# Altium PCB Copy of TQ210_BOARD_V4-20121031.PcbDoc (part 8 of 8)
Units mm, origin at the board's own origin, x right, y up, seen from the top; angles counter-clockwise.
Board outline 191.2 x 131.27 mm, 2 copper layers (TopLayer, BottomLayer); 362 components, 455 nets, 1594 pads, 630 vias.
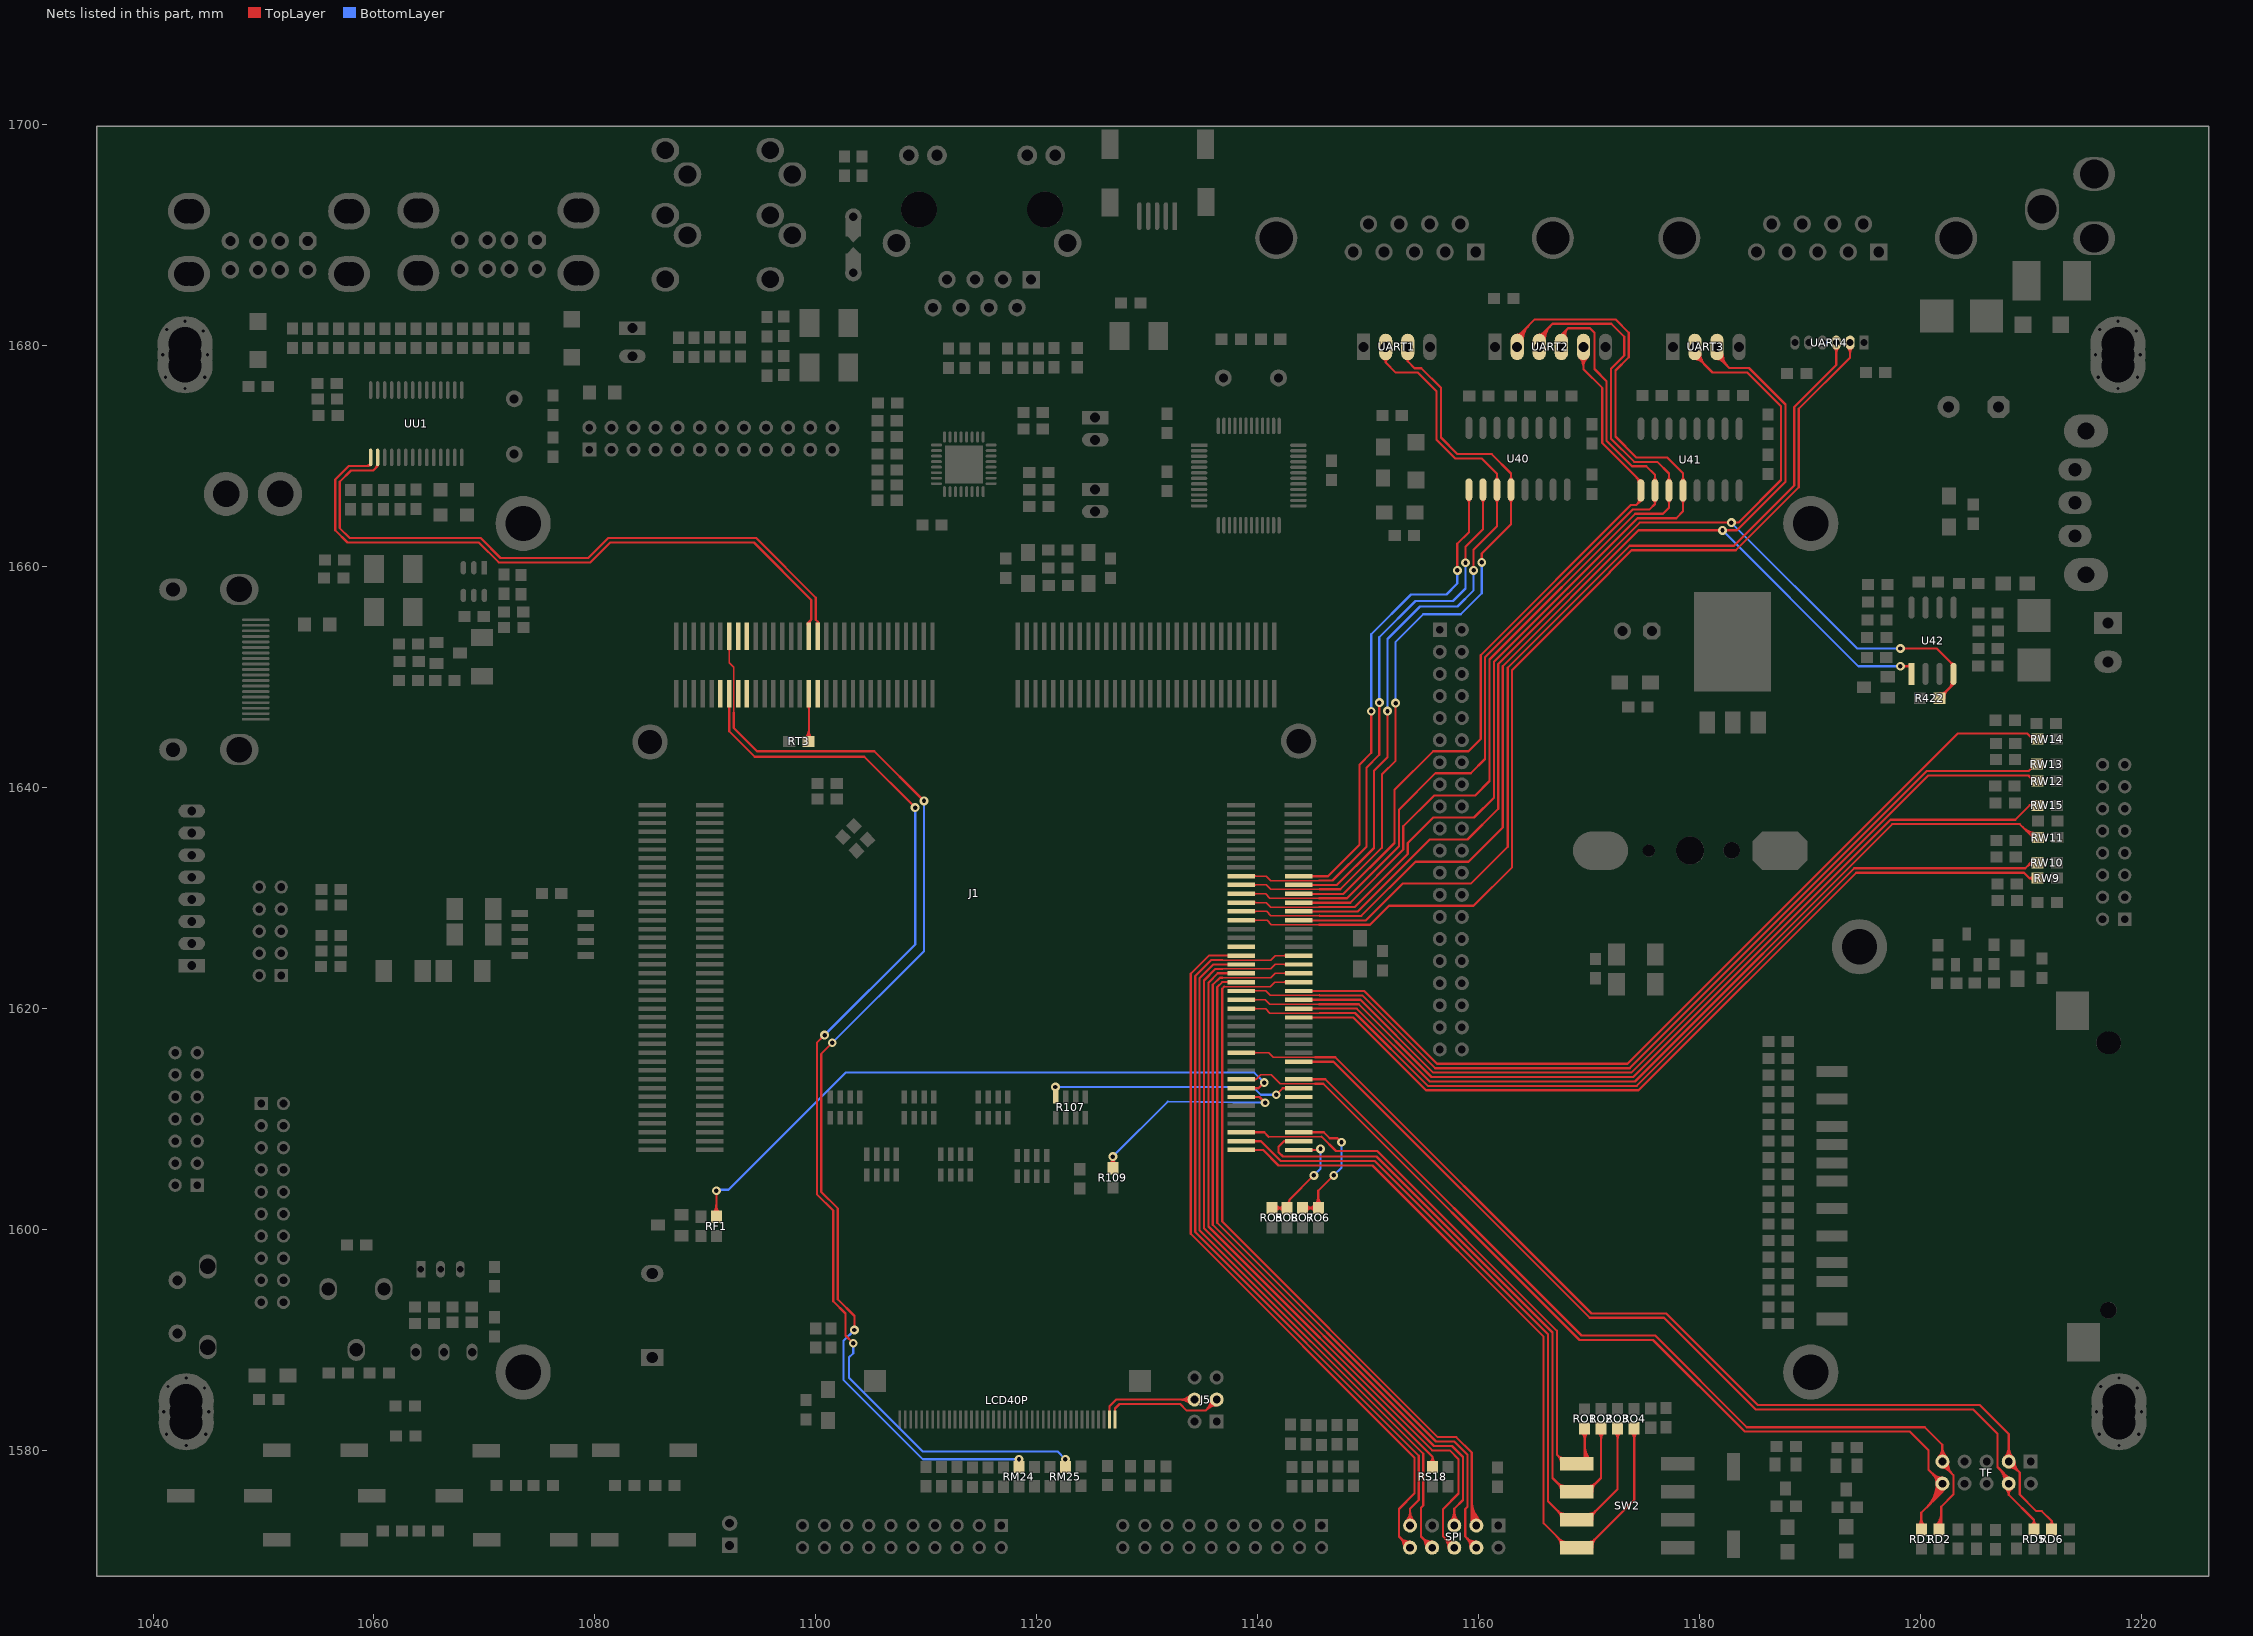
[diagram p8: the nets of this part, all layers, seen from the top]

## Via types
v1: diameter 1, hole 0.5, TopLayer to BottomLayer, 458 vias
v2: diameter 0.8, hole 0.4, TopLayer to BottomLayer, 172 vias

## Nets (pads, with @x,y where several pads share a name; then routed paths per layer and width w, separated by ;. In a path a pad name is that pad's centre, name@x,y a point inside that pad or via, vN(x,y) a via of type N, cw(c..) or ccw(c..) an arc to the next point about the centre after c; other vN are vias at no path point) (continued)
XMMC1DATA0: J1.263 RD2.2 TF.9 | length 89.9
  TopLayer w0.2: J1.263@1143.715,1613.595 1146.129,1613.595 1169.323,1590.4 1176,1590.4 1184.3,1582.1 1200.4,1582.1 1202,1580.5 TF.9@1202,1579 ; RD2.2@1201.417,1573.183 ccw(c1200.251,1574.349) 1201.9,1574.349 ; RD2.2@1201.559,1573.041 ccw(c1200.734,1573.866) 1201.9,1573.866 ; TF.9@1201.633,1579.367 ccw(c1200.746,1580.254) 1202,1580.254 ; RD2.2@1201.7,1572.9 ccw(c1201.217,1573.383) 1201.9,1573.383 ccw(c1202.183,1573.383) RD2.2@1201.983,1573.183 ; TF.9@1201.774,1579.226 ccw(c1201.229,1579.771) 1202,1579.771 ; RD2.2@1201.9,1572.85 1201.9,1574.9 1203,1576 1203,1577.75 1202.011,1578.739 TF.9@1202.011,1578.989 ; 1202,1579.824 ccw(c1202.846,1579.824) TF.9@1202.248,1579.226 ; 1202,1580.307 ccw(c1203.329,1580.307) TF.9@1202.389,1579.367 ; TF.9@1202.011,1578.454 cw(c1202.011,1577.765) 1202.498,1578.252 ; TF.9@1202.144,1578.968 ccw(c1202.759,1578.871) 1202.319,1578.431 ; TF.9@1202.342,1578.937 ccw(c1203.24,1578.796) 1202.597,1578.153 ; TF.9@1202.54,1578.906 ccw(c1203.72,1578.72) 1202.875,1577.875
XMMC1DATA1: J1.264 RD1.2 TF.10 | length 99
  TopLayer w0.135: J1.264@1138.515,1613.595 1139.9,1613.595 1140.305,1614 1141.234,1614 1142.039,1613.194 1145.194,1613.194 1145.2,1613.2 ; J1.264@1139.658,1613.501 cw(c1139.884,1613.275) 1139.884,1613.595 cw(c1139.884,1613.914) J1.264@1139.658,1613.688
  TopLayer w0.2: 1145.2,1613.2 1145.957,1613.2 1145.957,1613.195 1169.152,1590 1175.8,1590 1184.1,1581.7 1199.05,1581.7 1200.75,1580 1200.75,1578.25 TF.10@1202.011,1576.989 1202.011,1576.261 ; RD1.2@1199.817,1573.183 ccw(c1199.134,1573.866) 1200.1,1573.866 ccw(c1201.066,1573.866) RD1.2@1200.383,1573.183 ; RD1.2@1200.1,1572.85 1200.1,1574.35 1202.011,1576.261 ; 1200.583,1574.833 ccw(c1198.427,1576.989) 1201.476,1576.989 ccw(c1200.184,1576.989) 1201.098,1577.902 ccw(c1202.011,1578.815) TF.10@1202.011,1577.524 ; 1200.925,1575.175 ccw(c1199.11,1576.989) 1201.676,1576.989 ccw(c1200.867,1576.989) 1201.439,1577.561 ccw(c1202.011,1578.133) TF.10@1202.011,1577.324 ; 1201.266,1575.516 ccw(c1199.793,1576.989) TF.10@1201.876,1576.989 ; 1201.607,1575.857 ccw(c1200.476,1576.989) TF.10@1202.076,1576.989 ; TF.10@1201.851,1576.478 cw(c1201.784,1576.261) 1202.011,1576.261 ; 1201.949,1576.199 ccw(c1201.159,1576.989) TF.10@1202.276,1576.989 ; TF.10@1202.171,1576.478 ccw(c1202.239,1576.261) 1202.011,1576.261
XMMC1DATA2: J1.258 RD6.2 TF.3 | length 102.3
  TopLayer w0.135: J1.258@1138.515,1615.995 1141,1615.995 1141.401,1615.593 1145.193,1615.593 ; J1.258@1139.658,1615.901 cw(c1139.884,1615.675) 1139.884,1615.995 cw(c1139.884,1616.314) J1.258@1139.658,1616.088
  TopLayer w0.2: 1145.2,1615.6 1145.205,1615.595 1147.036,1615.595 1170.231,1592.4 1177,1592.4 1185.3,1584.1 1205.4,1584.1 1208.011,1581.489 TF.3@1208.011,1578.989 1209,1578 1209,1576 1210.5,1574.5 1211,1574.5 1211.9,1573.6 ; TF.3@1207.633,1579.367 ccw(c1206.719,1580.28) 1208.011,1580.28 ccw(c1209.303,1580.28) TF.3@1208.389,1579.367 ; TF.3@1207.774,1579.226 ccw(c1207.202,1579.798) 1208.011,1579.798 ccw(c1208.82,1579.798) TF.3@1208.248,1579.226 ; TF.3@1208.011,1578.454 cw(c1208.011,1577.162) 1208.924,1578.075 cw(c1209.838,1578.989) TF.3@1208.546,1578.989 ; TF.3@1208.011,1578.654 cw(c1208.011,1577.845) 1208.583,1578.417 cw(c1209.155,1578.989) TF.3@1208.346,1578.989 ; RD6.2@1211.697,1573.245 ccw(c1211.488,1573.6) 1211.9,1573.6 ; RD6.2@1211.9,1572.85 1211.9,1573.6 ; RD6.2@1212.103,1573.245 cw(c1212.312,1573.6) 1211.9,1573.6
XMMC1DATA3: J1.259 RD5.2 TF.4 | length 93.3
  TopLayer w0.2: J1.259@1143.715,1615.195 1146.871,1615.195 1170.065,1592 1176.8,1592 1178.162,1590.638 1185.1,1583.7 1204.8,1583.7 1207,1581.5 1207,1578.5 1208.011,1577.489 1208.011,1575.989 ; 1207.09,1578.41 cw(c1205.675,1576.995) TF.4@1207.676,1576.99 ; 1207.43,1578.07 cw(c1206.354,1576.993) TF.4@1207.876,1576.989 ; TF.4@1207.714,1576.544 cw(c1207.344,1575.989) 1208.011,1575.989 ; 1207.77,1577.73 cw(c1207.032,1576.992) TF.4@1208.076,1576.989 ; TF.4@1208.308,1576.544 ccw(c1208.678,1575.989) 1208.011,1575.989 ; RD5.2@1210.06,1573.22 ccw(c1209.7,1573.7) 1210.3,1573.7 ; RD5.2@1210.3,1572.85 1210.3,1573.7 ; RD5.2@1210.54,1573.22 cw(c1210.9,1573.7) 1210.3,1573.7 ; 1208.011,1575.989 1210.3,1573.7
XMMC2CDN: J1.92
XMMC2CLK: J1.96
XMMC2CMD: J1.95
XMMC2DATA0: J1.97 | length 0
  TopLayer w0.2: J1.97@1093.765,1653.697 J1.97@1093.775,1653.707
XMMC2DATA1: J1.98
XMMC2DATA2: J1.93 RM24.2 | length 105.7
  TopLayer w0.135: J1.93@1092.071,1652.553 cw(c1091.845,1652.327) 1092.165,1652.327 cw(c1092.484,1652.327) J1.93@1092.258,1652.553 ; J1.93@1092.165,1653.697 1092.165,1651.315 1092.564,1650.916 1092.564,1646.826
  TopLayer w0.2: 1092.581,1646.809 1092.581,1645.4 1094.681,1643.3 1105.3,1643.3 v2(1109.8,1638.8) ; v2(1101.5,1616.9) 1100.5,1615.9 1100.5,1603.4 1101.99,1601.91 1101.99,1593.676 1103.5,1592.166 v2(1103.5,1590.9)
  BottomLayer w0.2: v2(1101.5,1616.9) 1109.8,1625.2 v2(1109.8,1638.8) ; v2(1103.5,1590.9) 1102.5,1589.9 1102.5,1586.4 1109.7,1579.2 v2(1118.4,1579.2)
XMMC2DATA3: J1.94 RM25.2 | length 102.6
  TopLayer w0.2: J1.94@1092.175,1648.487 1092.175,1645.1 1094.475,1642.8 1104.4,1642.8 v2(1109,1638.2) ; v2(1100.8,1617.6) 1100.1,1616.9 1100.1,1603.2 1101.59,1601.71 1101.59,1593.51 1102.7,1592.4 1102.7,1590.4 v2(1103.4,1589.7)
  BottomLayer w0.2: v2(1100.8,1617.6) 1109,1625.8 v2(1109,1638.2) ; v2(1103.4,1589.7) 1103.4,1588.8 1103,1588.4 1103,1586.6 1109.7,1579.9 1121.9,1579.9 v2(1122.6,1579.2)
XMMC3CDN: J1.246 RW15.1 | length 86.5
  TopLayer w0.135: J1.246@1138.515,1620.795 1140.716,1620.795 1141.115,1620.395 1145.594,1620.395 ; J1.246@1139.658,1620.701 cw(c1139.884,1620.475) 1139.884,1620.795 cw(c1139.884,1621.114) J1.246@1139.658,1620.888
  TopLayer w0.2: 1145.595,1620.395 1145.6,1620.4 ; 1145.605,1620.395 1149.158,1620.395 1155.753,1613.8 1174.003,1613.8 1197.303,1637.1 1208.6,1637.1 1209.905,1638.405 ; RW15.1@1210.218,1638.217 ccw(c1209.905,1638.05) 1209.905,1638.405 ; RW15.1@1210.218,1638.593 cw(c1209.905,1638.76) 1209.905,1638.405 ; RW15.1@1210.621,1638.405 1209.905,1638.405
XMMC3CLK: J1.247 RW11.1 | length 82.7
  TopLayer w0.2: J1.247@1143.715,1619.995 1148.993,1619.995 1155.587,1613.4 1174.169,1613.4 1197.469,1636.7 1209,1636.7 RW11.1@1210.2,1635.5 ; 1209.268,1636.432 ccw(c1210.615,1637.778) RW11.1@1210.615,1635.874 ; 1209.61,1636.09 ccw(c1210.615,1637.095) RW11.1@1210.615,1635.674 ; 1209.951,1635.749 ccw(c1210.615,1636.412) RW11.1@1210.615,1635.474
XMMC3CMD: J1.245 RW12.1 | length 81.7
  TopLayer w0.2: J1.245@1143.715,1620.795 1149.324,1620.795 1155.919,1614.2 1173.837,1614.2 1200.737,1641.1 1209.8,1641.1 RW12.1@1210.3,1640.6 ; 1209.938,1640.962 ccw(c1210.157,1641.18) RW12.1@1210.338,1640.93 ; RW12.1@1210.084,1640.816 cw(c1209.873,1640.605) RW12.1@1210.171,1640.605 ; RW12.1@1210.104,1640.796 ccw(c1210.296,1640.987) RW12.1@1210.455,1640.767
XMMC3DATA0: J1.248 RW10.1 | length 86.1
  TopLayer w0.135: J1.248@1138.515,1619.995 1140.721,1619.995 1141.122,1619.593 1145.604,1619.593 ; J1.248@1139.658,1619.901 cw(c1139.884,1619.675) 1139.884,1619.995 cw(c1139.884,1620.314) J1.248@1139.658,1620.088
  TopLayer w0.2: 1145.605,1619.595 1148.827,1619.595 1155.422,1613 1174.334,1613 1194.034,1632.7 1209.5,1632.7 1210,1633.2 ; 1209.717,1632.917 cw(c1210.005,1632.628) RW10.1@1210.291,1632.919 ; 1209.86,1633.06 cw(c1210.147,1632.772) RW10.1@1210.431,1633.062 ; 1210.002,1633.202 cw(c1210.288,1632.916) RW10.1@1210.571,1633.205 ; RW10.1@1210.194,1633.338 cw(c1210,1633.406) 1210,1633.2 ; RW10.1@1210.197,1633.064 ccw(c1210,1632.989) 1210,1633.2 ; RW10.1@1210.4,1633.2 1210,1633.2
XMMC3DATA1: J1.249 RW9.1 | length 78.8
  TopLayer w0.2: J1.249@1143.715,1619.195 1148.661,1619.195 1155.256,1612.6 1174.5,1612.6 1194.2,1632.3 1209.4,1632.3 1209.895,1631.805 ; RW9.1@1210.221,1631.612 ccw(c1209.895,1631.433) 1209.895,1631.805 ; RW9.1@1210.221,1631.998 cw(c1209.895,1632.177) 1209.895,1631.805 ; RW9.1@1210.621,1631.805 1209.895,1631.805
XMMC3DATA2: J1.243 RW14.1 | length 83.1
  TopLayer w0.2: J1.243@1143.715,1621.595 1149.655,1621.595 1156.25,1615 1173.5,1615 ; 1173.503,1614.997 1203.406,1644.9 1209.7,1644.9 1210.195,1644.405 RW14.1@1210.621,1644.405 ; 1209.888,1644.712 ccw(c1210.101,1644.925) RW14.1@1210.303,1644.701 ; 1210.037,1644.563 ccw(c1210.242,1644.769) RW14.1@1210.437,1644.553
XMMC3DATA3: J1.244 RW13.1 | length 86.4
  TopLayer w0.135: J1.244@1138.515,1621.595 1140.753,1621.595 1141.154,1621.194 1145.594,1621.194
  TopLayer w0.2: 1145.6,1621.2 1145.605,1621.195 1149.49,1621.195 1156.084,1614.6 1173.7,1614.6 ; 1173.672,1614.6 1200.572,1641.5 1209.8,1641.5 1210.427,1642.127 RW13.1@1210.585,1642.127
XOM0: J1.275 RO6.2 RO7.1 | length 17.1
  TopLayer w0.2: J1.275@1143.715,1608.795 1146.005,1608.795 1146.532,1608.268 1147.232,1608.268 v2(1147.6,1607.9) ; RO7.1@1144.078,1601.944 1145.504,1601.944 1145.504,1603.504 v2(1146.9,1604.9) ; RO7.1@1144.361,1601.661 cw(c1145.044,1600.978) 1145.044,1601.944 cw(c1145.044,1602.91) RO7.1@1144.361,1602.227 ; RO7.1@1144.538,1601.944 cw(c1144.538,1600.976) RO6.2@1145.222,1601.661 ; RO7.1@1144.541,1601.944 ccw(c1144.541,1602.908) RO6.2@1145.222,1602.226 ; RO6.2@1145.222,1602.276 ccw(c1144.541,1602.958) 1145.504,1602.958 ; 1145.504,1602.96 ccw(c1146.472,1602.96) RO6.2@1145.788,1602.276
  BottomLayer w0.2: v2(1146.9,1604.9) 1147.6,1605.6 v2(1147.6,1607.9)
XOM1: J1.276 RO1.2 SW2.1 | length 61.1
  TopLayer w0.135: 1141,1608.4 1141.005,1608.395 1145.795,1608.395
  TopLayer w0.2: J1.276@1138.515,1608.795 1140.605,1608.795 1141,1608.4 ; J1.276@1139.635,1608.724 cw(c1139.806,1608.553) 1139.806,1608.795 cw(c1139.806,1609.036) J1.276@1139.635,1608.865 ; 1145.8,1608.4 1147.1,1607.1 1150.834,1607.1 1167.1,1590.834 1167.1,1579.6 1167.9,1578.8 SW2.1@1169.9,1578.8 ; 1167.15,1579.55 ccw(c1167.791,1580.191) SW2.1@1167.926,1579.294 ; 1167.217,1579.483 cw(c1166.534,1578.8) SW2.1@1167.5,1578.8 ; SW2.1@1167.43,1579.27 ccw(c1167.864,1579.704) SW2.1@1167.955,1579.097 ; RO1.2@1169.339,1581.633 cw(c1168.656,1580.95) 1169.622,1580.95 cw(c1170.588,1580.95) RO1.2@1169.905,1581.633 ; SW2.1@1169.446,1579.154 ccw(c1169.023,1579.577) 1169.622,1579.577 ; SW2.1@1169.622,1578.922 RO1.2@1169.622,1581.966 ; 1169.622,1579.471 ccw(c1170.471,1579.471) SW2.1@1169.871,1578.871 ; 1169.622,1579.954 ccw(c1170.954,1579.954) SW2.1@1170.012,1579.012 ; 1169.622,1580.437 ccw(c1171.437,1580.437) SW2.1@1170.154,1579.154
XOM2: J1.277 RO2.1 SW2.2 | length 63.2
  TopLayer w0.2: J1.277@1143.715,1607.995 1142.395,1607.995 1141.9,1607.5 1141.9,1607 1142.3,1606.6 1150.769,1606.6 1166.7,1590.669 1166.7,1577.5 SW2.2@1168.2,1576 ; 1167.044,1577.156 ccw(c1168,1578.112) SW2.2@1168,1576.76 ; 1167.189,1577.011 cw(c1166.438,1576.26) SW2.2@1167.5,1576.26 ; 1167.385,1576.815 ccw(c1168,1577.429) SW2.2@1168,1576.56 ; SW2.2@1167.53,1576.67 cw(c1167.121,1576.26) SW2.2@1167.7,1576.26 ; SW2.2@1169.8,1576.56 ccw(c1169.8,1577.429) 1170.415,1576.815 ; SW2.2@1169.8,1576.76 ccw(c1169.8,1578.112) 1170.756,1577.156 ; SW2.2@1169.86,1576.26 1171.1,1577.5 RO2.1@1171.1,1582 ; SW2.2@1170.1,1576.26 cw(c1170.679,1576.26) SW2.2@1170.27,1576.67 ; SW2.2@1170.3,1576.26 cw(c1171.362,1576.26) 1170.611,1577.011 ; RO2.1@1170.817,1581.667 cw(c1170.134,1580.984) 1171.1,1580.984 cw(c1172.066,1580.984) RO2.1@1171.383,1581.667
XOM3: J1.278 RO3.1 SW2.3 | length 70.2
  TopLayer w0.2: J1.278@1138.515,1607.995 1140.305,1607.995 1142.1,1606.2 1150.603,1606.2 1166.3,1590.503 1166.3,1575.4 SW2.3@1168.2,1573.5 ; J1.278@1139.635,1607.924 cw(c1139.806,1607.753) 1139.806,1607.995 cw(c1139.806,1608.236) J1.278@1139.635,1608.065 ; 1167.112,1574.588 ccw(c1168,1575.475) SW2.3@1168,1574.22 ; 1167.161,1574.539 cw(c1166.341,1573.72) SW2.3@1167.5,1573.72 ; SW2.3@1167.454,1574.246 ccw(c1168,1574.793) SW2.3@1168,1574.02 ; SW2.3@1167.502,1574.198 cw(c1167.024,1573.72) SW2.3@1167.7,1573.72 ; SW2.3@1169.8,1574.02 ccw(c1169.8,1574.793) SW2.3@1170.346,1574.246 ; SW2.3@1169.8,1574.22 ccw(c1169.8,1575.475) 1170.688,1574.588 ; SW2.3@1169.82,1573.72 1172.6,1576.5 RO3.1@1172.6,1582 ; SW2.3@1170.1,1573.72 cw(c1170.776,1573.72) SW2.3@1170.298,1574.198 ; SW2.3@1170.3,1573.72 cw(c1171.459,1573.72) 1170.639,1574.539 ; RO3.1@1172.317,1581.667 cw(c1171.634,1580.984) 1172.6,1580.984 cw(c1173.566,1580.984) RO3.1@1172.883,1581.667
XOM4: J1.279 RO5.2 RO8.1 | length 14.7
  TopLayer w0.2: RO5.2@1141.305,1601.943 RO8.1@1142.657,1601.943 ; RO5.2@1141.588,1601.661 cw(c1142.271,1600.978) 1142.271,1601.943 cw(c1142.271,1602.909) RO5.2@1141.588,1602.226 ; RO5.2@1141.661,1601.943 cw(c1141.661,1600.905) RO8.1@1142.395,1601.639 ; RO5.2@1141.764,1601.943 ccw(c1141.764,1602.836) RO8.1@1142.395,1602.205 ; 1142.144,1601.943 cw(c1142.144,1601.387) RO8.1@1142.537,1601.781 ; RO8.1@1142.616,1602.367 ccw(c1142.563,1602.7) 1142.9,1602.7 ; RO8.1@1142.647,1602.17 ccw(c1142.6,1602.466) RO8.1@1142.9,1602.466 ; RO8.1@1142.9,1601.8 1142.9,1602.7 v2(1145.1,1604.9) ; J1.279@1143.715,1607.195 1145.595,1607.195 v2(1145.7,1607.3) ; J1.279@1144.835,1607.124 cw(c1145.006,1606.953) 1145.006,1607.195 cw(c1145.006,1607.436) J1.279@1144.835,1607.265
  BottomLayer w0.2: v2(1145.1,1604.9) 1145.7,1605.5 v2@1145.7,1607.2
XOM5: J1.280 RO4.1 SW2.4 | length 74.9
  TopLayer w0.2: J1.280@1138.515,1607.206 1140.494,1607.206 1141.9,1605.8 1150.4,1605.8 1165.9,1590.3 1165.9,1573.4 SW2.4@1168.3,1571 ; J1.280@1139.635,1607.135 cw(c1139.806,1606.965) 1139.806,1607.206 cw(c1139.806,1607.447) J1.280@1139.635,1607.277 ; 1167.062,1572.238 cw(c1166.003,1571.18) SW2.4@1167.5,1571.18 ; 1167.351,1571.949 ccw(c1168,1572.597) SW2.4@1168,1571.68 ; 1167.403,1571.897 cw(c1166.686,1571.18) SW2.4@1167.7,1571.18 ; SW2.4@1169.78,1571.18 1174.1,1575.5 RO4.1@1174.1,1582 ; SW2.4@1169.8,1571.48 ccw(c1169.8,1572.156) SW2.4@1170.278,1571.678 ; SW2.4@1169.8,1571.68 ccw(c1169.8,1572.839) 1170.619,1572.019 ; SW2.4@1170.1,1571.18 cw(c1170.873,1571.18) SW2.4@1170.326,1571.726 ; SW2.4@1170.3,1571.18 cw(c1171.555,1571.18) 1170.668,1572.068 ; RO4.1@1173.817,1581.667 cw(c1173.134,1580.984) 1174.1,1580.984 cw(c1175.066,1580.984) RO4.1@1174.383,1581.667
XPWMTOUT0: J1.265 R107.4 | length 22.6
  TopLayer w0.2: v2(1141.7,1612.2) 1142.284,1612.784 J1.265@1143.725,1612.784
  BottomLayer w0.2: v2(1121.7,1612.9) 1139.6,1612.9 1140.3,1612.2 v2(1141.7,1612.2)
XPWMTOUT1: J1.266 RF1.2 | length 61
  TopLayer w0.2: RF1.2@1090.712,1601.482 ccw(c1090.03,1602.167) 1090.997,1602.165 ; RF1.2@1090.995,1601.048 v2(1091,1603.5) ; 1090.997,1602.163 ccw(c1091.962,1602.161) RF1.2@1091.278,1601.48 ; J1.266@1138.525,1612.784 1140.084,1612.784 v2(1140.6,1613.3) ; J1.266@1139.635,1612.724 cw(c1139.781,1612.578) 1139.781,1612.784 ; J1.266@1139.635,1612.865 ccw(c1139.831,1613.061) 1139.831,1612.784
  BottomLayer w0.2: v2(1091,1603.5) v2@1091,1603.603 ; v2@1091.057,1603.604 1092.092,1603.604 1102.688,1614.2 1139.7,1614.2 v2(1140.6,1613.3)
XPWMTOUT2: J1.267
XPWMTOUT3: J1.268 R109.2 | length 21.2
  TopLayer w0.2: R109.2@1126.617,1605.883 ccw(c1125.934,1606.566) 1126.9,1606.566 ccw(c1127.866,1606.566) R109.2@1127.183,1605.883 ; R109.2@1126.9,1605.55 v2(1126.9,1606.6) ; J1.268@1138.515,1611.995 1140.172,1611.995 v2(1140.689,1611.478) ; J1.268@1139.635,1611.924 cw(c1139.806,1611.753) 1139.806,1611.995 cw(c1139.806,1612.236) J1.268@1139.635,1612.065
  BottomLayer w0.2: v2(1126.9,1606.6) 1131.879,1611.578 v2(1140.689,1611.478)
XPWRRGTON: J1.234
XSPICLK0: J1.236 SPI.10 | length 69.9
  TopLayer w0.2: J1.236@1138.515,1624.795 1135.595,1624.795 1133.95,1623.15 1133.95,1599.604 1154.2,1579.354 1154.2,1576.1 1152.8,1574.7 1152.8,1572.2 SPI.10@1153.811,1571.189 ; SPI.10@1153.276,1571.189 ccw(c1151.984,1571.189) 1152.898,1572.102 ccw(c1153.811,1573.015) SPI.10@1153.811,1571.724 ; SPI.10@1153.476,1571.189 ccw(c1152.667,1571.189) 1153.239,1571.761 ccw(c1153.811,1572.333) SPI.10@1153.811,1571.524
XSPICLK1: J1.239 SPI.5 | length 71.6
  TopLayer w0.135: 1136.795,1622.795 1141.185,1622.795 1141.585,1623.195 J1.239@1143.715,1623.195 ; J1.239@1142.571,1623.101 ccw(c1142.345,1622.875) 1142.345,1623.195 ccw(c1142.345,1623.514) J1.239@1142.571,1623.288
  TopLayer w0.2: 1136.795,1622.795 1136.595,1622.795 1135.95,1622.15 1135.95,1600.432 1155.982,1580.4 1157.6,1580.4 1158.6,1579.4 1158.6,1575.5 1157.811,1574.711 SPI.5@1157.811,1573.189 ; SPI.5@1157.433,1573.567 ccw(c1156.519,1574.48) 1157.811,1574.48 ccw(c1159.103,1574.48) SPI.5@1158.189,1573.567 ; SPI.5@1157.574,1573.426 ccw(c1157.002,1573.998) 1157.811,1573.998 ccw(c1158.62,1573.998) SPI.5@1158.048,1573.426
XSPICSN0: J1.237 RS18.1 | length 63.5
  TopLayer w0.135: 1136.796,1623.593 1141.194,1623.593 1141.595,1623.995 J1.237@1143.715,1623.995 ; J1.237@1142.571,1623.901 ccw(c1142.345,1623.675) 1142.345,1623.995 ccw(c1142.345,1624.314) J1.237@1142.571,1624.088
  TopLayer w0.2: 1136.795,1623.595 1136.195,1623.595 1135.15,1622.55 1135.15,1600.101 1155.85,1579.401 ; RS18.1@1155.595,1578.858 ccw(c1155.145,1579.401) 1155.85,1579.401 ; RS18.1@1155.85,1578.5 1155.85,1579.401 ; RS18.1@1156.105,1578.858 cw(c1156.555,1579.401) 1155.85,1579.401
XSPICSN1: J1.241 SPI.3 | length 73
  TopLayer w0.135: 1136.995,1621.995 1141.152,1621.995 1141.552,1622.395 J1.241@1143.715,1622.395 ; J1.241@1142.571,1622.301 ccw(c1142.345,1622.075) 1142.345,1622.395 ccw(c1142.345,1622.714) J1.241@1142.571,1622.488
  TopLayer w0.2: 1136.995,1621.995 1136.795,1621.795 1136.795,1600.719 1156.314,1581.2 1158,1581.2 1159.4,1579.8 1159.4,1573.6 SPI.3@1159.811,1573.189 ; 1159.4,1574.024 ccw(c1160.646,1574.024) SPI.3@1159.765,1573.143 ; 1159.4,1574.507 ccw(c1161.129,1574.507) SPI.3@1159.906,1573.284 ; 1159.4,1574.99 ccw(c1161.612,1574.99) SPI.3@1160.048,1573.426 ; 1159.4,1575.473 ccw(c1162.095,1575.473) SPI.3@1160.189,1573.567
XSPIMISO0: J1.235 SPI.9 | length 72.4
  TopLayer w0.135: 1136.796,1624.396 1141.196,1624.396 1141.595,1624.795 J1.235@1143.715,1624.795 ; J1.235@1142.571,1624.701 ccw(c1142.345,1624.475) 1142.345,1624.795 ccw(c1142.345,1625.114) J1.235@1142.571,1624.888
  TopLayer w0.2: 1136.795,1624.395 1135.795,1624.395 1134.35,1622.95 1134.35,1599.77 1154.6,1579.52 1154.6,1575.5 1153.811,1574.711 SPI.9@1153.811,1573.189 ; SPI.9@1153.433,1573.567 ccw(c1152.519,1574.48) 1153.811,1574.48 ccw(c1155.103,1574.48) SPI.9@1154.189,1573.567 ; SPI.9@1153.574,1573.426 ccw(c1153.002,1573.998) 1153.811,1573.998 ccw(c1154.62,1573.998) SPI.9@1154.048,1573.426
XSPIMISO1: J1.240 SPI.6 | length 69.1
  TopLayer w0.2: J1.240@1138.515,1623.195 1136.4,1623.195 1135.55,1622.345 1135.55,1600.267 1155.817,1580 1157.4,1580 1158.2,1579.2 1158.2,1576.1 1156.8,1574.7 1156.8,1572.2 SPI.6@1157.811,1571.189 ; SPI.6@1157.276,1571.189 ccw(c1155.984,1571.189) 1156.898,1572.102 ccw(c1157.811,1573.015) SPI.6@1157.811,1571.724 ; SPI.6@1157.476,1571.189 ccw(c1156.667,1571.189) 1157.239,1571.761 ccw(c1157.811,1572.333) SPI.6@1157.811,1571.524
XSPIMOSI0: J1.238 SPI.8 | length 68
  TopLayer w0.2: J1.238@1138.515,1623.995 1135.995,1623.995 1134.75,1622.75 1134.75,1599.935 1155,1579.685 1155,1575 1154.8,1574.8 1154.8,1572.2 SPI.8@1155.811,1571.189 ; SPI.8@1155.276,1571.189 ccw(c1153.984,1571.189) 1154.898,1572.102 ccw(c1155.811,1573.015) SPI.8@1155.811,1571.724 ; SPI.8@1155.476,1571.189 ccw(c1154.667,1571.189) 1155.239,1571.761 ccw(c1155.811,1572.333) SPI.8@1155.811,1571.524
XSPIMOSI1: J1.242 SPI.4 | length 67.3
  TopLayer w0.2: J1.242@1138.515,1622.395 1136.795,1622.395 1136.35,1621.95 1136.35,1600.598 1156.148,1580.8 1157.8,1580.8 1159,1579.6 1159,1574.9 1158.8,1574.7 1158.8,1572.2 SPI.4@1159.811,1571.189 ; SPI.4@1159.276,1571.189 ccw(c1157.984,1571.189) 1158.898,1572.102 ccw(c1159.811,1573.015) SPI.4@1159.811,1571.724 ; SPI.4@1159.476,1571.189 ccw(c1158.667,1571.189) 1159.239,1571.761 ccw(c1159.811,1572.333) SPI.4@1159.811,1571.524
XUCTSN0: J1.217 U40.9 | length 45.6
  TopLayer w0.2: J1.217@1143.725,1631.984 1146.384,1631.984 ; 1146.395,1631.995 1149.223,1634.823 1149.223,1642.085 1150.29,1643.151 v2(1150.29,1646.917) ; v2(1158.09,1659.674) 1158.09,1662.09 1159.138,1663.138 U40.9@1159.138,1666.989 ; U40.9@1158.994,1666.133 cw(c1158.644,1665.784) 1159.138,1665.784 cw(c1159.633,1665.784) U40.9@1159.283,1666.133
  BottomLayer w0.2: v2(1150.29,1646.917) 1150.29,1653.89 1153.9,1657.5 1157.1,1657.5 1158.09,1658.49 v2(1158.09,1659.674)
XUCTSN1: J1.221 U41.9 UART2.5 | length 73.4
  TopLayer w0.2: J1.221@1143.725,1630.384 1147.784,1630.384 1152.4,1635 1152.4,1639.8 1155.9,1643.3 1159.1,1643.3 1160.2,1644.4 1160.2,1652 1173.8,1665.6 1174.3,1665.6 1174.71,1666.01 1174.71,1667.69 1171.2,1671.2 1171.2,1676.2 1169.508,1677.892 UART2.5@1169.508,1679.902 ; UART2.5@1169.154,1678.948 cw(c1168.301,1678.095) 1169.508,1678.095 cw(c1170.715,1678.095) UART2.5@1169.861,1678.948 ; UART2.5@1169.296,1679.09 cw(c1168.784,1678.578) 1169.508,1678.578 cw(c1170.232,1678.578) UART2.5@1169.72,1679.09 ; 1174.313,1668.087 cw(c1173.849,1667.623) U41.9@1174.505,1667.623 ; 1174.395,1665.695 ccw(c1174.07,1666.021) U41.9@1174.513,1666.145 ; 1174.474,1667.926 ccw(c1174.71,1668.161) U41.9@1174.71,1667.828
XUHDN: J1.111 UU1.15 | length 61.3
  TopLayer w0.2: 1059.258,1669.123 ccw(c1059.258,1669.691) UU1.15@1059.66,1669.289 ; 1059.54,1669.14 cw(c1059.695,1668.984) UU1.15@1059.695,1669.204 ; UU1.15@1059.695,1669.904 1059.695,1669.295 1059.523,1669.123 1057.723,1669.123 1056.5,1667.9 1056.5,1663.3 1057.6,1662.2 1069.5,1662.2 1071.3,1660.4 1079.6,1660.4 1081.4,1662.2 1094.4,1662.2 1099.6,1657 1099.6,1655.225 ; J1.111@1099.267,1654.727 cw(c1099.521,1654.779) 1099.337,1654.962 ; J1.111@1099.297,1654.82 ccw(c1099.13,1655) 1099.375,1655 ; J1.111@1099.375,1653.687 1099.375,1655 ; 1099.375,1654.963 ccw(c1099.581,1654.963) J1.111@1099.435,1654.818 ; J1.111@1099.463,1654.767 cw(c1099.957,1654.868) 1099.6,1655.225 ; 1099.375,1655 1099.6,1655.225
XUHDP: J1.113 UU1.16 | length 60.8
  TopLayer w0.2: 1060.157,1668.957 ccw(c1059.86,1669.254) UU1.16@1060.28,1669.254 ; UU1.16@1060.33,1669.904 1060.33,1669.13 1059.923,1668.723 1057.923,1668.723 1056.9,1667.7 1056.9,1663.5 1057.8,1662.6 1069.666,1662.6 1071.466,1660.8 1079.4,1660.8 1081.2,1662.6 1094.6,1662.6 1100,1657.2 1100,1655.2 1100.175,1655.025 J1.113@1100.175,1653.687 ; J1.113@1100.094,1654.818 ccw(c1099.898,1655.013) 1100.175,1655.013 ; 1100.154,1655.046 cw(c1099.883,1654.775) J1.113@1100.264,1654.737 ; 1100.175,1654.963 ccw(c1100.381,1654.963) J1.113@1100.235,1654.818
XUHOVERCUR: J1.112 RT3.2 | length 6.7
  TopLayer w0.2: RT3.2@1099.067,1644.483 ccw(c1098.324,1645.226) 1099.375,1645.226 ; RT3.2@1099.209,1644.341 ccw(c1098.807,1644.743) 1099.375,1644.743 ; J1.112@1099.294,1647.376 cw(c1099.098,1647.181) 1099.375,1647.181 ; RT3.2@1099.375,1644.125 J1.112@1099.375,1648.487 ; 1099.375,1645.105 ccw(c1100.255,1645.105) RT3.2@1099.633,1644.483 ; 1099.375,1647.231 cw(c1099.581,1647.231) J1.112@1099.435,1647.376
XUHPWREN: J1.114
XURTSN0: J1.218 U40.10 | length 52.7
  TopLayer w0.135: J1.218@1138.515,1631.995 1140.805,1631.995 1141.207,1631.594 1145.594,1631.594 ; J1.218@1139.658,1631.901 cw(c1139.884,1631.675) 1139.884,1631.995 cw(c1139.884,1632.314) J1.218@1139.658,1632.088
  TopLayer w0.2: 1145.595,1631.595 1146.795,1631.595 1149.858,1634.658 1149.858,1641.805 1151.026,1642.974 v2(1151.026,1647.698) ; v2(1158.825,1660.367) 1158.825,1661.825 1160.408,1663.408 U40.10@1160.408,1666.989 ; U40.10@1160.264,1666.133 cw(c1159.914,1665.784) 1160.408,1665.784 cw(c1160.903,1665.784) U40.10@1160.553,1666.133
  BottomLayer w0.2: v2(1151.026,1647.698) 1151.025,1653.625 1154.3,1656.9 1157.7,1656.9 1158.825,1658.025 v2(1158.825,1660.367)
XURTSN1: J1.222 U41.10 UART2.4 | length 87.4
  TopLayer w0.135: J1.222@1138.515,1630.395 1140.72,1630.395 1141.12,1629.995 1145.595,1629.995 ; J1.222@1139.658,1630.301 cw(c1139.884,1630.075) 1139.884,1630.395 cw(c1139.884,1630.714) J1.222@1139.658,1630.488
  TopLayer w0.2: 1145.6,1630 1145.595,1629.995 1148.095,1629.995 1152.8,1634.7 1152.8,1638 1156.1,1641.3 1159.3,1641.3 1160.6,1642.6 1160.6,1651.8 1174,1665.2 1175.5,1665.2 1175.98,1665.68 1175.98,1668.32 1175.2,1669.1 1173.9,1669.1 1171.6,1671.4 1171.6,1676.8 1170.5,1677.9 1170.5,1681.2 1170.1,1681.6 1168.1,1681.6 ; UART2.4@1167.508,1679.902 1167.508,1681.008 1168.1,1681.6 ; UART2.4@1167.597,1680.546 cw(c1168.111,1680.801) 1167.706,1681.206 ; UART2.4@1167.777,1680.635 cw(c1168.375,1680.931) 1167.903,1681.403 ; UART2.4@1167.956,1680.724 cw(c1168.638,1681.061) 1168.1,1681.6 ; U41.10@1175.835,1666.056 cw(c1175.486,1665.706) 1175.98,1665.706 cw(c1176.474,1665.706) U41.10@1176.125,1666.056 ; U41.10@1175.835,1667.768 ccw(c1175.486,1668.118) 1175.98,1668.118 ccw(c1176.474,1668.118) U41.10@1176.125,1667.768
XURXD0: J1.220 U40.12 UART1.3 | length 75.3
  TopLayer w0.135: J1.220@1138.515,1631.195 1140.805,1631.195 1141.205,1630.795 1145.595,1630.795 ; J1.220@1139.658,1631.101 cw(c1139.884,1630.875) 1139.884,1631.195 cw(c1139.884,1631.514) J1.220@1139.658,1631.288
  TopLayer w0.2: 1145.6,1630.8 1147.5,1630.8 1151.255,1634.555 1151.255,1641.196 1152.5,1642.44 v2(1152.498,1647.658) ; UART1.3@1153.438,1678.827 cw(c1153.36,1678.6) 1153.6,1678.6 ; UART1.3@1153.6,1679.9 1153.6,1678.6 ; UART1.3@1153.762,1678.827 ccw(c1153.84,1678.6) 1153.6,1678.6 ; v2(1160.3,1660.4) 1160.3,1661.2 1162.948,1663.848 1162.948,1668.452 1161.2,1670.2 1158.1,1670.2 1156.6,1671.7 1156.6,1676.2 1154.819,1677.981 1154.219,1677.981 1153.6,1678.6 ; U40.12@1162.804,1666.133 cw(c1162.454,1665.784) 1162.948,1665.784 cw(c1163.443,1665.784) U40.12@1163.093,1666.133 ; U40.12@1162.804,1667.845 ccw(c1162.454,1668.195) 1162.948,1668.195 ccw(c1163.443,1668.195) U40.12@1163.093,1667.845
  BottomLayer w0.2: v2(1152.498,1647.658) v2@1152.498,1647.8 ; v2@1152.5,1647.8 1152.5,1653.2 1155,1655.7 1158.4,1655.7 1160.3,1657.6 v2(1160.3,1660.4)
XURXD1: J1.224 U41.12 UART2.2 | length 101.7
  TopLayer w0.135: J1.224@1138.515,1629.595 1140.781,1629.595 1141.182,1629.194 1145.594,1629.194 ; J1.224@1139.658,1629.501 cw(c1139.884,1629.275) 1139.884,1629.595 cw(c1139.884,1629.914) J1.224@1139.658,1629.688
  TopLayer w0.2: 1145.595,1629.195 1145.6,1629.2 1148.8,1629.2 1153.6,1634 1153.6,1635 1155.9,1637.3 1159.6,1637.3 1161.4,1639.1 1161.4,1651.4 1174.4,1664.4 1177.9,1664.4 1178.52,1665.02 1178.52,1668.48 1177.1,1669.9 1174.3,1669.9 1172.4,1671.8 1172.4,1677.766 1173.6,1678.966 1173.6,1681.2 1172.4,1682.4 1165.1,1682.4 1163.508,1680.808 UART2.2@1163.508,1679.902 ; UART2.2@1163.508,1681.002 ccw(c1163.508,1681.471) 1163.839,1681.139 ; UART2.2@1163.608,1680.502 cw(c1164.587,1680.502) 1163.895,1681.195 ; UART2.2@1163.808,1680.502 cw(c1165.27,1680.502) 1164.236,1681.536 ; UART2.2@1164.008,1680.502 cw(c1165.953,1680.502) 1164.578,1681.878 ; U41.12@1178.375,1666.056 cw(c1178.026,1665.706) 1178.52,1665.706 cw(c1179.014,1665.706) U41.12@1178.665,1666.056 ; U41.12@1178.375,1667.768 ccw(c1178.026,1668.118) 1178.52,1668.118 ccw(c1179.014,1668.118) U41.12@1178.665,1667.768
XURXD2: J1.226 U42.1 UART3.3 | length 117.1
  TopLayer w0.135: J1.226@1138.515,1628.795 1140.814,1628.795 1141.213,1628.396 1145.596,1628.396 ; J1.226@1139.658,1628.701 cw(c1139.884,1628.475) 1139.884,1628.795 cw(c1139.884,1629.114) J1.226@1139.658,1628.888
  TopLayer w0.2: 1145.6,1628.4 1145.605,1628.395 1149.395,1628.395 1154.3,1633.3 1159.1,1633.3 1162.2,1636.4 1162.2,1651 1174.5,1663.3 1183.403,1663.3 1187.8,1667.697 1187.8,1674.7 1184.5,1678 1182.7,1678 1181.6,1679.1 UART3.3@1181.6,1680 ; UART3.3@1181.6,1678.8 cw(c1181.6,1678.076) 1182.112,1678.588 ; UART3.3@1181.9,1679.3 ccw(c1183.107,1679.3) 1182.254,1678.446 ; UART3.3@1182.1,1679.3 ccw(c1183.79,1679.3) 1182.595,1678.105 ; v2(1198.2,1651) 1199.2,1651 1199.209,1650.991 U42.1@1199.209,1650.311 ; 1198.7,1651 ccw(c1198.7,1651.545) U42.1@1199.085,1651.16 ; 1198.872,1651 cw(c1198.872,1650.7) U42.1@1199.085,1650.912
  BottomLayer w0.2: v2(1182.1,1663.3) 1194.4,1651 v2(1198.2,1651)
XURXD3: J1.228 UART4.2 | length 94.2
  TopLayer w0.135: J1.228@1138.515,1627.995 1140.861,1627.995 1141.262,1627.594 1145.582,1627.594 ; J1.228@1139.658,1627.901 cw(c1139.884,1627.675) 1139.884,1627.995 cw(c1139.884,1628.314) J1.228@1139.658,1628.088
  TopLayer w0.2: 1145.588,1627.588 1150.188,1627.588 1151.908,1629.308 1159.558,1629.308 1163.05,1632.8 1163.05,1650.65 1171.883,1659.483 ; 1171.866,1659.5 1173.866,1661.5 1183.3,1661.5 1189,1667.2 1189,1674.3 1193.65,1678.95 UART4.2@1193.65,1680.3 ; UART4.2@1193.433,1679.855 cw(c1192.91,1679.332) 1193.65,1679.332 cw(c1194.39,1679.332) UART4.2@1193.867,1679.855
XUTXD0: J1.219 U40.11 UART1.2 | length 69.3
  TopLayer w0.2: J1.219@1143.725,1631.184 1147.184,1631.184 ; 1147.2,1631.2 1150.544,1634.544 1150.544,1641.526 1151.763,1642.745 v2(1151.763,1646.936) ; UART1.2@1151.381,1678.851 cw(c1151.21,1678.5) 1151.6,1678.5 ; UART1.2@1151.6,1679.9 1151.6,1678.5 ; UART1.2@1151.819,1678.851 ccw(c1151.99,1678.5) 1151.6,1678.5 ; v2(1159.563,1659.674) 1159.563,1661.563 1161.678,1663.678 1161.678,1668.422 1160.3,1669.8 1157.9,1669.8 1156.2,1671.5 1156.2,1675.9 1154.519,1677.581 1152.519,1677.581 1151.6,1678.5 ; U40.11@1161.534,1666.133 cw(c1161.184,1665.784) 1161.678,1665.784 cw(c1162.173,1665.784) U40.11@1161.823,1666.133 ; U40.11@1161.534,1667.845 ccw(c1161.184,1668.195) 1161.678,1668.195 ccw(c1162.173,1668.195) U40.11@1161.823,1667.845
  BottomLayer w0.2: v2(1151.763,1646.936) 1151.763,1653.463 1154.7,1656.4 1158.1,1656.4 1159.563,1657.863 v2(1159.563,1659.674)
XUTXD1: J1.223 U41.11 UART2.3 | length 90.3
  TopLayer w0.2: J1.223@1143.725,1629.584 1148.384,1629.584 1153.2,1634.4 1153.2,1636.5 1156,1639.3 1159.7,1639.3 1161,1640.6 1161,1651.6 1174.2,1664.8 1176.7,1664.8 1177.25,1665.35 1177.25,1668.45 1176.2,1669.5 1174.1,1669.5 1172,1671.6 1172,1677.931 1173.2,1679.131 1173.2,1680.834 1172.034,1682 1166.7,1682 1165.508,1680.808 UART2.3@1165.508,1679.902 ; UART2.3@1165.508,1681.002 ccw(c1165.508,1681.471) 1165.839,1681.139 ; UART2.3@1165.608,1680.502 cw(c1166.587,1680.502) 1165.895,1681.195 ; UART2.3@1165.808,1680.502 cw(c1167.27,1680.502) 1166.236,1681.536 ; UART2.3@1166.008,1680.502 cw(c1167.953,1680.502) 1166.578,1681.878 ; U41.11@1177.105,1666.056 cw(c1176.756,1665.706) 1177.25,1665.706 cw(c1177.744,1665.706) U41.11@1177.395,1666.056 ; U41.11@1177.105,1667.768 ccw(c1176.756,1668.118) 1177.25,1668.118 ccw(c1177.744,1668.118) U41.11@1177.395,1667.768
XUTXD2: J1.225 R422.2 U42.4 UART3.2 | length 120
  TopLayer w0.2: J1.225@1143.725,1628.784 1149.084,1628.784 1155.6,1635.3 1159,1635.3 1161.8,1638.1 1161.8,1651.2 1174.6,1664 1183.537,1664 1187.4,1667.863 1187.4,1674.534 1184.334,1677.6 1181.2,1677.6 1179.6,1679.2 UART3.2@1179.6,1679.9 ; UART3.2@1179.6,1678.8 cw(c1179.6,1677.834) 1180.283,1678.517 ; UART3.2@1179.9,1679.3 ccw(c1180.866,1679.3) 1180.183,1678.617 ; UART3.2@1180.1,1679.3 ccw(c1181.549,1679.3) 1180.524,1678.276 ; v2(1198.2,1652.6) 1201.5,1652.6 1203.019,1651.081 1203.019,1649.386 R422.2@1201.73,1648.098 ; R422.2@1201.78,1648.498 ccw(c1201.78,1649.343) 1202.378,1648.745 ; R422.2@1201.98,1648.098 cw(c1202.584,1648.098) R422.2@1202.157,1648.524 ; R422.2@1202.18,1648.098 cw(c1203.267,1648.098) 1202.498,1648.866 ; 1202.579,1648.946 ccw(c1201.939,1649.586) U42.4@1202.844,1649.586 ; 1202.688,1651.412 cw(c1202.311,1651.036) U42.4@1202.844,1651.036 ; 1202.798,1651.302 ccw(c1203.019,1651.523) U42.4@1203.019,1651.211 ; 1202.92,1649.287 ccw(c1202.621,1649.586) U42.4@1203.044,1649.586
  BottomLayer w0.2: v2(1182.9,1664) 1194.3,1652.6 v2(1198.2,1652.6)
XUTXD3: J1.227 UART4.3 | length 86.4
  TopLayer w0.2: J1.227@1143.715,1627.995 J1.227@1143.722,1627.988 ; J1.227@1143.725,1627.984 1149.784,1627.984 1153.115,1631.315 1159.315,1631.315 1162.65,1634.65 1162.65,1650.85 1173.7,1661.9 1183.134,1661.9 1188.6,1667.366 1188.6,1674.466 1192.4,1678.266 UART4.3@1192.4,1680.3 ; UART4.3@1192.183,1679.855 cw(c1191.66,1679.332) 1192.4,1679.332 cw(c1193.14,1679.332) UART4.3@1192.617,1679.855
YM1: J5.4 LCD40P.39 | length 15.9
  TopLayer w0.2: LCD40P.39@1126.6,1582.6 LCD40P.39@1126.6,1582.8 1126.6,1584 1127.2,1584.6 J5.4@1134.3,1584.6 ; 1133.008,1584.6 cw(c1133.008,1583.308) 1133.922,1584.222 ccw(c1133.008,1583.308) 1133.008,1584.6 ; 1133.008,1584.6 ccw(c1133.008,1585.892) 1133.922,1584.978 cw(c1133.008,1585.892) 1133.008,1584.6 ; 1133.491,1584.6 cw(c1133.491,1583.791) 1134.063,1584.363 ccw(c1133.491,1583.791) 1133.491,1584.6 ; 1133.491,1584.6 ccw(c1133.491,1585.409) 1134.063,1584.837 cw(c1133.491,1585.409) 1133.491,1584.6
YP1: J5.3 LCD40P.40 | length 17.6
  TopLayer w0.2: LCD40P.40@1127.1,1582.8 1127.1,1583.8 1127.5,1584.2 1133,1584.2 1133.6,1583.6 1135.3,1583.6 J5.3@1136.3,1584.6 ; 1135.387,1583.687 cw(c1136.3,1582.773) 1136.3,1584.065 ccw(c1136.3,1582.773) 1135.387,1583.687 ; 1135.387,1583.687 ccw(c1134.473,1584.6) 1135.765,1584.6 cw(c1134.473,1584.6) 1135.387,1583.687 ; 1135.728,1584.028 cw(c1136.3,1583.456) 1136.3,1584.265 ccw(c1136.3,1583.456) 1135.728,1584.028 ; 1135.728,1584.028 ccw(c1135.156,1584.6) 1135.965,1584.6 cw(c1135.156,1584.6) 1135.728,1584.028
pads on no net: BAT1.0 COM1. COM1.1 COM1.4 COM1.6 COM1.9 COM2. COM2.1 COM2.4 COM2.6 COM2.9 CON8. HDMI.14 J1.0 J10.1 J20.1 J30.1 J40.1 LCD40P.A LCD40P.B NET.7 NET.A NET.B NET.C NET.D RST.A RST.B S1.3 S1.4 S1.5 UART4.4 USBOTG.6 UT2.19 UT2.20 UT2.21 UT2.46 UT5.15 UT5.30 UU1.22 UU1.23 UU1.24 UU1.25 UU1.26 UU1.27

## Polygon pours and split planes (outlines as drawn)
GND on TopLayer "TopLayer-GND" (hatched 90Degree grid 0.3 track 0.3, remove dead copper, pour order 0): 1039,1568.8 1222,1568.8 1222,1699.8 1124.4,1699.8 1124.4,1681.6 1105.6,1681.6 1105.6,1699.8 1039,1699.8
GND on BottomLayer "BottomLayer-GND" (hatched 90Degree grid 0.3 track 0.3, remove dead copper, pour order 2): 1039,1568.8 1222,1568.8 1222,1699.8 1124.3,1699.8 1124.3,1681.6 1105.7,1681.6 1105.7,1699.8 1039,1699.8

## Keep-outs
KeepOutLayer:
  lines w0.2: 1039,1571 1035,1571 1035,1698 1039,1698 ; 1222,1571 1226,1571 1226,1697.75 1222,1697.75
  lines w0.254: 1039,1697.7 cw(c1041.025,1697.725) 1041,1699.75 1220,1699.75 cw(c1220,1697.75) 1222,1697.75 1222,1570.75 cw(c1220,1570.75) 1220,1568.75 ; 1039,1697.75 1039,1570.75 ccw(c1041.016,1570.75) 1041.016,1568.734 ; 1041,1568.75 1220.25,1568.75

## Other copper
TopLayer:
  rectangle net GND: 1122.2,1661.1 1127.3,1663.4
  rectangle net GND_AC97: 1116.7,1661 1121.6,1663.4
  rectangle net NetDC_IN_1: 1213.841,1684.096 1218.641,1691.31
  rectangle net GND_AC97: 1085.545,1697.1 1096.721,1698.3
  rectangle net VDD5V: 1107,1582.3 1108.168,1583.3
  rectangle net NetFUSE_2: 1206,1669.2 1209.4,1687.7
  rectangle net 3V3_IO: 1174.8,1648.7 1186.4,1657.7
  rectangle net 3V3_IO: 1174.8,1646.8 1177.1,1649.3
  rectangle net GND: 1199.261,1680.591 1202.969,1684.757
  rectangle net GND_AC97: 1090.8,1680.3 1091.802,1697.764
  rectangle net GND_AC97: 1095.118,1678.5 1097.7,1681.292
BottomLayer:
  rectangle net 3V3_IO: 1174.8,1646.8 1177.1,1654.9

## Silkscreen, mask and mechanical layers (free items; w line width, h text height)
TopOverlay:
  drawing of 163 lines, arcs and shapes, not listed
  text "5V" at 1221.5,1688.75 h1.02 r90
  text "T0" at 1152.4,1683.7 h1.02 r90
  text "R0" at 1154.3,1683.7 h1.02 r90
  text "5V" at 1165.7,1683.7 h1.02 r90
  text "R1" at 1167.1,1683.7 h1.02 r90
  text "T1" at 1168.5,1683.7 h1.02 r90
  text "RT1" at 1169.9,1683.7 h1.02 r90
  text "CT1" at 1171.3,1683.7 h1.02 r90
  text "GND" at 1173.1,1683.7 h1.02 r90
  text "3V3" at 1150.25,1683.5 h1.02 r90
  text "T2" at 1180,1683.5 h1.02 r90
  text "R2" at 1182,1683.5 h1.02 r90
  text "5V" at 1178.3,1683.4 h1.02 r90
  text "GND" at 1184.3,1683.4 h1.02 r90
  text "GND" at 1156.3,1683.3 h1.02 r90
  text "+" at 1083.9,1683.1 h1.52
  text "IO" at 1189.2,1682.3 h1.02 r90
  text "GND" at 1190.5,1682.3 h1.02 r90
  text "NC" at 1191.8,1682.3 h1.02 r90
  text "T3" at 1193.1,1682.3 h1.02 r90
  text "R3" at 1194.4,1682.3 h1.02 r90
  text "5V" at 1195.7,1682.3 h1.02 r90
  text "A" at 1074.522,1680.134 h1.14
  text "C" at 1110.072,1678.184 h1.14
  text "OFF" at 1208.75,1665.75 h1.52 r90
  text "ON" at 1208.75,1661.75 h1.52 r90
  text "C" at 1081,1660 h1.14
  text "A" at 1221.25,1657.5 h1.52 r90
  text "B" at 1221.25,1648 h1.52 r90
  text "A" at 1075.4,1641.3 h1.14
  text "OM3" at 1167.541,1597.885 h0.89
  text "OM5" at 1170.791,1597.885 h0.89
  text "DEVICE" at 1174.041,1597.885 h0.89
  text "OM1" at 1161.4,1597.8 h0.89
  text "OM2" at 1164.341,1597.785 h0.89
  text "TQ210_BOARD_V4" at 1101.59,1597.1 h2
  text "NAND" at 1174.791,1596.135 h0.89
  text "ON" at 1161.7,1595.4 h0.89
  text "OFF" at 1170.791,1595.385 h0.89
  text "OFF" at 1167.5,1595.3 h0.89
  text "OFF" at 1164.341,1595.285 h0.89
  text "2K/5C" at 1174.291,1594.885 h0.89
  text "UART" at 1174.541,1593.135 h0.89
  text "Resistive" at 1143.984,1592.964 h0.8
  text "ON" at 1171.2,1592.4 h0.89
  text "USB" at 1174.9,1591.9 h0.89
  text "touch screen" at 1143.2,1591.7 h0.8
  text "OFF" at 1161.2,1589.8 h0.89
  text "ON" at 1164.6,1589.8 h0.89
  text "ON" at 1167.9,1589.8 h0.89
  text "OFF" at 1170.8,1589.8 h0.89
  text "SD/MMC" at 1174.038,1589.722 h0.89
  text "Capacitive" at 1144,1587.5 h0.8
  text "touch screen" at 1143.1,1586.2 h0.8
  text "B" at 1212.722,1583.934 h1.14
  text "Home/Munu" at 1080.7,1582.4 h1
  text "Enter" at 1071.7,1582.3 h1
  text "OM1" at 1164.4,1578.3 h1.02
  text "OM2" at 1164.4,1575.8 h1.02
  text "ESC" at 1074.2,1574.5 h1
  text "POWER" at 1083.6,1574.3 h1
  text "OM3" at 1164.4,1573.3 h1.02
  text "B" at 1214.822,1571.434 h1.14
  text "OM5" at 1164.4,1570.7 h1.02

## Text inside footprints (layer, text, board x,y; h text height)
BUZZER: TopOverlay "+" at 1083.676,1587.892 h1.52 r90
HDMI: TopOverlay "1" at 1049.55,1645.45 h1.02 r270; TopOverlay "19" at 1049.55,1657.2 h1.02 r270
J1: TopOverlay "1-10" at 1083.822,1606.903 h0.64 r90; TopOverlay "81-90" at 1087.047,1655.163 h0.64; TopOverlay "191-200" at 1138.197,1655.188 h0.64; TopOverlay "281-280" at 1145.022,1610.703 h0.64 r270; TopOverlay "141-150" at 1117.047,1655.188 h0.64; TopOverlay "201-210" at 1145.122,1639.897 h0.64 r270; TopOverlay "131-140" at 1107.572,1655.214 h0.64; TopOverlay "71-80" at 1083.847,1635.478 h0.64 r90
MIC2: TopOverlay "+" at 1084.416,1682.108 h1.52 r270
NET: TopOverlay "1" at 1119.5,1688.5 h1.27 r180; TopOverlay "7" at 1112,1688.5 h1.27 r180
WIFI2: TopOverlay "1" at 1218.512,1626.338 h0.76; TopOverlay "2" at 1216.262,1626.338 h0.76; TopOverlay "15" at 1218.012,1643.338 h0.76; TopOverlay "16" at 1216.012,1643.338 h0.76